# Altium PCB rp2350_led_control_pcb.PcbDoc (part 3 of 4)
Units mm, origin at the board's own origin, x right, y up, seen from the top; angles counter-clockwise.
Board outline 143.9 x 131.3 mm, 4 copper layers (L1(SIG), L2(GND), L3(PWR), L4(SIG)), stack 1.591 mm thick; 168 components, 192 nets, 814 pads, 1003 vias.
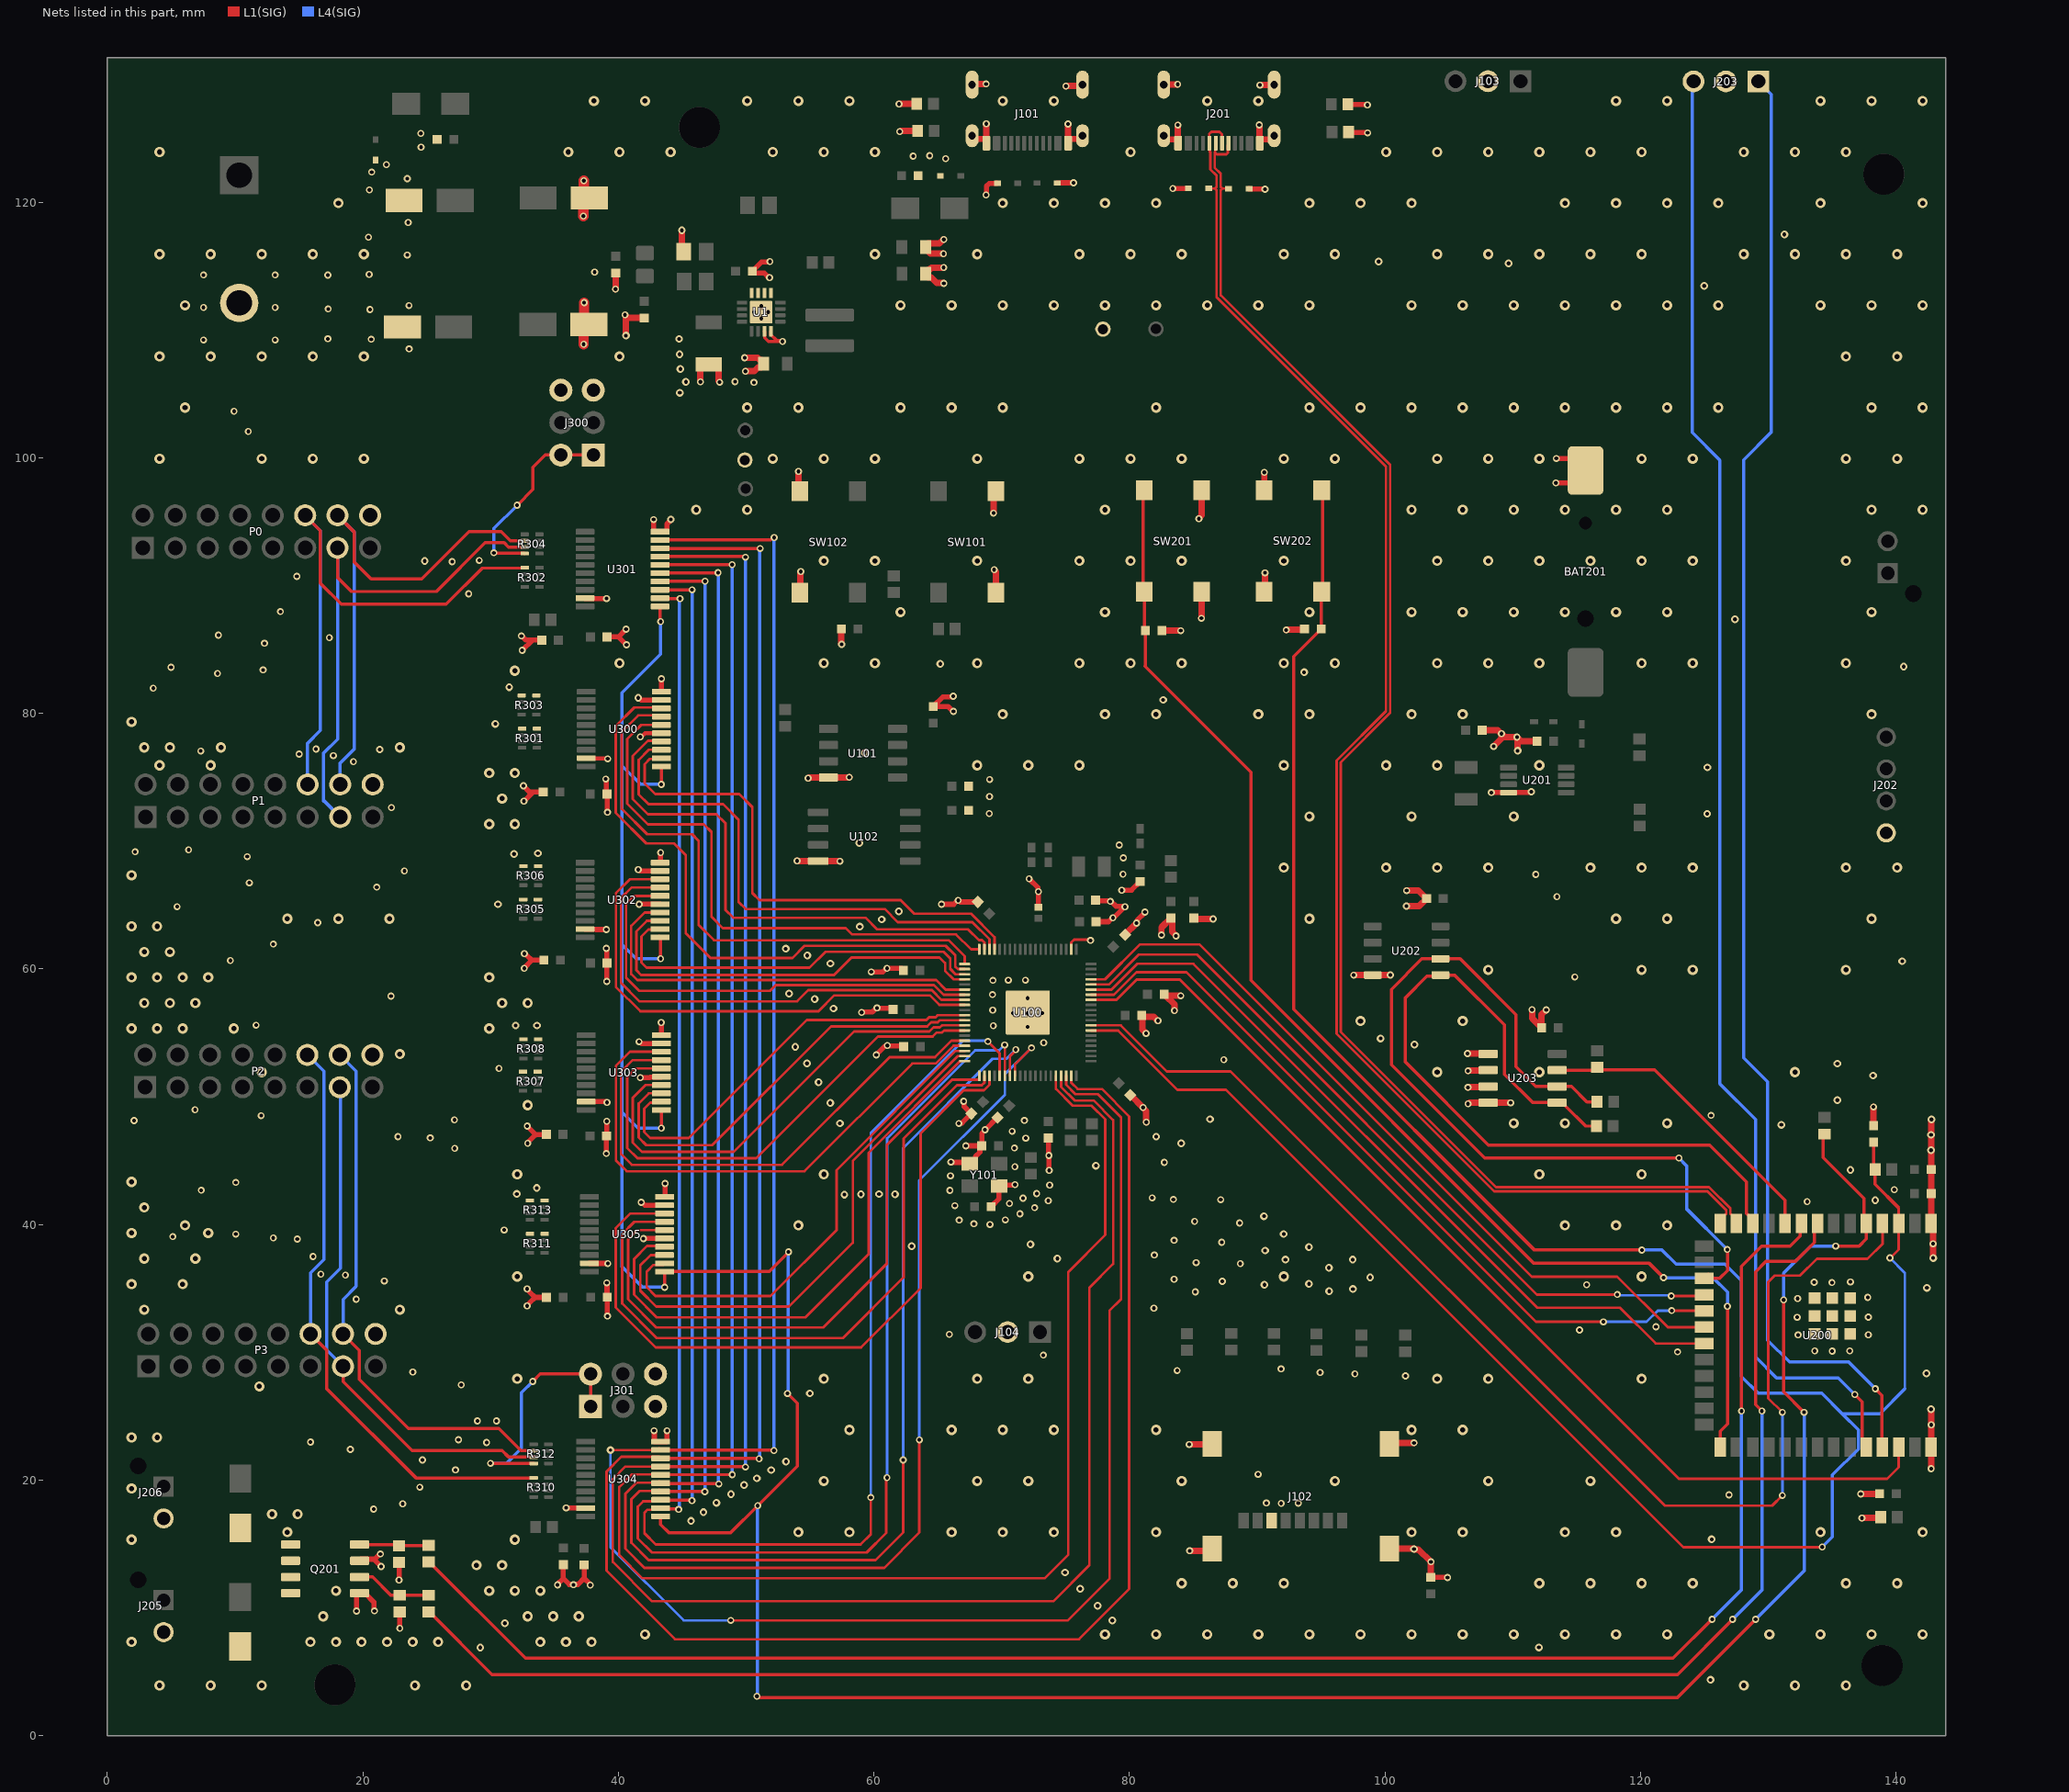
[diagram p4: the nets of this part, all layers, seen from the top]

## Via types
v1: diameter 0.55, hole 0.3, L1(SIG) to L4(SIG), 508 vias
v2: diameter 0.8, hole 0.4, L1(SIG) to L4(SIG), 383 vias
v3: diameter 0.6, hole 0.3, L1(SIG) to L4(SIG), 111 vias
v4: diameter 0.6, hole 0.25, L1(SIG) to L4(SIG), 1 vias

## Nets (pads, with @x,y where several pads share a name; then routed paths per layer and width w, separated by ;. In a path a pad name is that pad's centre, name@x,y a point inside that pad or via, vN(x,y) a via of type N, cw(c..) or ccw(c..) an arc to the next point about the centre after c; other vN are vias at no path point) (continued)
CLK_0: P0.13 P1.13 R304.6 | length 41.3
  L1(SIG) w0.25: P0.13@18.02,92.95 18.02,90.608 19.094,89.534 25.756,89.534 29.572,93.349 31.055,93.349 31.396,93.009 R304.6@32.658,93.009 ; P1.13@18.186,71.89 P1.13@18.22,71.89
  L4(SIG) w0.25: P0.13@18.02,92.95 18.02,77.973 16.899,76.852 16.899,73.142 16.968,73.142 P1.13@18.22,71.89
CLK_1: P2.13 P3.13 R312.6 | length 41.4
  L1(SIG) w0.25: P3.13@18.448,28.896 18.448,27.713 23.86,22.3 30.903,22.3 31.381,21.822 33.348,21.822 R312.6@33.373,21.797
  L4(SIG) w0.25: P2.13@18.194,50.74 18.249,50.685 18.249,36.57 17.172,35.493 17.172,30.172 P3.13@18.448,28.896
D0: P0.12 P1.12 R302.8 | length 45.7
  L1(SIG) w0.25: P0.12@15.48,95.49 16.667,94.302 16.667,90.182 18.313,88.536 26.515,88.536 29.344,91.365 32.369,91.365 32.645,91.365 R302.8@32.67,91.39 ; P1.12@15.667,74.443 P1.12@15.68,74.43
  L4(SIG) w0.25: P0.12@15.48,95.49 16.666,94.304 16.666,93.004 cw(c15.48,92.95) 16.666,92.896 16.666,78.651 15.654,77.639 15.654,74.456 P1.12@15.68,74.43
D1: P2.12 P3.12 R310.8 | length 46.7
  L1(SIG) w0.25: P3.12@15.908,31.436 17.15,30.194 17.15,27.175 24.157,20.168 R310.8@33.373,20.168
  L4(SIG) w0.25: P2.12@15.654,53.28 16.939,51.995 16.939,37.258 15.908,36.227 P3.12@15.908,31.436
E0: J300.1 J300.2 R304.5 | length 15.5
  L1(SIG) w0.25: v1(30.246,92.563) 30.276,92.534 32.633,92.534 R304.5@32.658,92.509 ; v1(32.071,96.284) 33.313,97.526 33.313,99.255 34.27,100.212 J300.1@38.033,100.212
  L4(SIG) w0.25: v1(30.246,92.563) 30.246,94.464 32.066,96.284 v1(32.071,96.284)
E1: J301.1 J301.2 R312.5 | length 19.2
  L1(SIG) w0.25: v1(29.989,21.31) 29.995,21.304 33.366,21.304 R312.5@33.373,21.297 ; v1(33.294,27.718) 33.882,28.307 37.813,28.307 J301.2@37.82,28.3 J301.1@37.82,25.76
  L4(SIG) w0.25: v1(29.989,21.31) 31.234,21.31 32.418,22.494 32.418,26.842 v1(33.294,27.718)
EEPROM_WP: R211.2 U200.10 U203.7 | length 24.1
  L1(SIG) w0.25: U203.7@113.474,52.075 116.375,52.075 R211.2@116.6,52.3 116.8,52.1 121.1,52.1 131.314,41.886 U200.10@131.314,40.19 ; U200.10@131.2,40.19 U200.10@131.314,40.076
EN_DISPLAY: R208.2 U200.5 U300.1 U301.1 U302.1 U303.1 U304.1 U305.1 | length 257
  L1(SIG) w0.25: U302.1@43.2,62.565 43.3,62.465 v1(43.3,60.8) ; U301.1@43.258,88.365 43.258,87.226 v1(43.3,87.184) ; U304.1@43.304,17.157 43.304,16.538 43.981,15.861 48.761,15.861 v1(50.9,18) 53.99,21.09 53.99,26.022 v1(53.234,26.778) ; v1(43.358,47.542) U303.1@43.358,48.965 ; v1(43.358,74.442) U300.1@43.358,75.843 ; v1(43.612,35.088) U305.1@43.612,36.311 43.629,36.328 51.803,36.328 53.313,37.837 v1(53.313,37.854) ; v1(50.843,3.087) 50.925,3.087 51.051,2.961 122.861,2.961 v1(129,9.1) ; v1(131.2,34.1) 131.2,26.9 v1(132.8,25.3) ; R208.2@134.393,47.076 134.284,46.967 134.284,45.252 137.5,42.036 137.5,40.54 137.664,40.376 U200.5@137.664,40.076 137.664,38.864 137.109,38.309 v1(135.273,38.309)
  L4(SIG) w0.25: v1(43.3,60.8) 41.387,60.8 40.287,61.9 ; v1(43.3,87.184) 43.3,84.626 40.287,81.612 40.287,75.9 ; v1(43.358,47.542) 41.545,47.542 40.287,48.8 ; v1(43.358,74.442) 41.745,74.442 40.287,75.9 ; v1(43.612,35.088) 41.899,35.088 40.287,36.7 40.287,48.8 ; v1(50.843,3.087) 50.872,3.115 50.872,17.972 v1(50.9,18) ; v1(53.234,26.778) 53.273,26.818 53.273,37.814 v1(53.313,37.854) ; v1(129,9.1) 132.8,12.9 v1(132.8,25.3) ; v1(131.2,34.1) 131.2,36.2 133.309,38.309 v1(135.273,38.309) ; 40.287,48.8 40.287,61.9 ; 40.287,61.9 40.287,75.9
ESP-USB_N: D203.2 J201.A7 J201.B7 U200.13 | length 116.8
  L1(SIG) w0.2: 86.663,123.911 86.663,122.7 87.144,122.22 87.144,121.182 87.261,121.065 ; 86.7,123.948 86.7,124.575 J201.A7@86.75,124.625 ; 86.734,123.86 86.851,123.743 87.583,123.743 87.7,123.86 87.7,124.467 J201.B7@87.734,124.501 ; D203.2@87.755,121.049 87.739,121.065 87.261,121.065 ; U200.13@127.504,40.076 127.504,40.376 127.154,40.726 127.15,40.726 127.032,40.843 127.032,41.261 125.367,42.927 108.673,42.927 96.534,55.066 96.534,76.172 100.4,80.038 100.4,99.45 87.142,112.708 87.142,114.718 87.144,114.72 87.144,120.948 87.261,121.065
ESP-USB_P: D204.2 J201.A6 J201.B6 U200.14 | length 117.8
  L1(SIG) w0.2: D204.2@86.206,121.08 86.221,121.065 86.7,121.065 ; J201.B6@86.234,124.625 86.234,125.334 86.415,125.515 87.033,125.515 87.234,125.314 J201.A6@87.234,124.501 ; J201.B6@86.25,124.625 86.3,124.575 86.3,123.948 86.336,123.911 86.336,122.565 86.817,122.084 86.817,121.182 86.7,121.065 ; U200.14@126.234,40.076 126.234,40.376 126.584,40.726 126.588,40.726 126.705,40.843 126.705,41.126 125.231,42.6 108.538,42.6 96.207,54.93 96.207,76.307 100.073,80.173 100.073,99.314 86.815,112.572 86.815,114.854 86.817,114.855 86.817,120.948 86.7,121.065
ESP_BOOT: C208.2 SW201.3 SW201.4 U200.27 | length 101.7
  L1(SIG) w0.25: SW201.3@81.155,97.461 81.071,97.376 81.071,89.595 SW201.4@81.155,89.511 81.155,86.564 C208.2@81.244,86.475 81.244,83.732 81.206,83.695 89.501,75.4 89.501,59.099 111.641,36.959 120.682,36.959 v1(121.802,35.839) ; U200.27@126.234,22.576 126.234,23.834 126.8,24.4 v1(126.8,33.6)
  L4(SIG) w0.25: v1(121.802,35.839) 125.661,35.839 126.8,34.7 v1(126.8,33.6)
ESP_BUSY: U100.53 U200.38 | length 82
  L1(SIG) w0.2: U100.53@76.992,57.582 78.982,57.582 80.561,59.161 83.939,59.161 123,20.1 139.3,20.1 140.204,21.004 U200.38@140.204,22.576
ESP_CS: U100.56 U200.18 | length 60.1
  L1(SIG) w0.2: U100.56@76.992,58.782 78.382,58.782 80.723,61.123 85.277,61.123 111.881,34.519 v1(118.181,34.519) ; v1(122.4,34.4) 124.883,34.4 U200.18@124.984,34.501
  L4(SIG) w0.2: v1(118.181,34.519) 118.241,34.46 122.34,34.46 v1(122.4,34.4)
ESP_DAT_RDY: U100.48 U200.4 | length 98.9
  L1(SIG) w0.2: U100.48@76.992,55.582 79.318,55.582 82.913,51.987 87.913,51.987 121.9,18 130.3,18 v1(131.1,18.8) ; v1(131.1,25.3) 130,26.4 130,35.5 130.5,36 132.482,36 133.794,37.312 137.761,37.312 138.934,38.485 U200.4@138.934,40.076
  L4(SIG) w0.2: v1(131.1,18.8) v1(131.1,25.3)
ESP_DBG_RX: J203.3 U200.36 | length 115.4
  L1(SIG) w0.25: v1(136.768,26.699) 137.339,26.129 137.339,22.901 U200.36@137.664,22.576
  L4(SIG) w0.25: J203.3@124.143,129.454 124.039,129.349 124.039,101.982 126.212,99.809 126.212,51.006 129,48.218 129,29.638 130.641,27.997 135.471,27.997 v1(136.768,26.699)
ESP_DBG_TX: J203.1 U200.37 | length 115.4
  L1(SIG) w0.25: v1(138.379,27.143) 138.885,26.637 138.885,22.625 U200.37@138.934,22.576
  L4(SIG) w0.25: J203.1@129.223,129.454 130.235,128.443 130.235,102 128.077,99.842 128.077,53.046 129.953,51.17 129.953,30.947 131.664,29.236 136.286,29.236 v1(138.379,27.143)
ESP_MISO: U100.55 U200.21 | length 61.1
  L1(SIG) w0.2: U100.55@76.992,58.382 78.582,58.382 80.6,60.4 85,60.4 111.913,33.487 118.38,33.487 121.176,30.691 U200.21@124.984,30.691
ESP_MOSI: U100.54 U200.19 | length 60.4
  L1(SIG) w0.2: U100.54@76.992,57.982 78.782,57.982 80.538,59.738 84.462,59.738 111.816,32.384 v1(117.091,32.384) ; v1(122.436,33.259) 124.956,33.259 U200.19@124.984,33.231
  L4(SIG) w0.2: v1(117.091,32.384) 120.475,32.384 121.351,33.259 v1(122.436,33.259)
ESP_RESET: C206.2 C209.2 R203.2 SW202.3 SW202.4 U100.47 U200.3 | length 214.3
  L1(SIG) w0.2: U100.47@76.992,55.182 79.118,55.182 83.754,50.546 87.554,50.546 123.353,14.747 134.202,14.747 v1(134.217,14.763) ; v1(139.515,37.382) 139.545,37.382 140.204,38.041 U200.3@140.204,40.076
  L1(SIG) w0.25: SW202.3@95.05,89.325 95,89.275 C209.2@95,86.6 92.851,84.451 92.851,56.849 111.7,38 112.5,38 v1(120.1,38) ; SW202.3@95.092,89.743 95.122,89.773 SW202.4@95.122,97.461 ; C206.2@138.239,46.439 138.239,44.43 R203.2@138.36,44.309 138.36,43.14 140.2,41.3 U200.3@140.2,40.076
  L4(SIG) w0.2: v1(139.515,37.382) 140.684,36.213 140.684,27.147
  L4(SIG) w0.25: v1(120.1,38) 121.674,38 122.781,36.893 126.607,36.893 127.9,35.6 127.9,28.1 129.2,26.8 134.178,26.8 135.78,25.198 ; v1(134.217,14.763) 135.013,15.559 135.013,20.397 137.048,22.432 137.048,23.93 135.78,25.198 ; 140.684,27.147 138.735,25.198 135.78,25.198
ESP_SCK: U100.57 U200.20 | length 61.5
  L1(SIG) w0.2: U100.57@76.992,59.182 78.082,59.182 80.808,61.908 85.492,61.908 111.478,35.922 118.178,35.922 122.139,31.961 U200.20@124.984,31.961
FAN1_CMD: R212.1 U200.8 | length 141.4
  L1(SIG) w0.25: R212.1@25.151,9.687 25.201,9.687 30.102,4.786 122.886,4.786 v1(127.2,9.1) ; v1(129.5,25.4) 129,25.9 129,36.3 129.8,37.1 132.1,37.1 133.6,38.6 133.6,39.822 U200.8@133.854,40.076
  L4(SIG) w0.25: v1(127.2,9.1) 129.5,11.4 v1(129.5,25.4)
FAN1_GATE: Q201.2 R210.2 R212.2 | length 6
  L1(SIG) w0.254: Q201.2@19.742,12.415 20.755,12.415 22.177,10.993 22.878,10.993 R210.2@22.884,10.987 R212.2@25.151,10.987
FAN1_OUT: D205.2 J205.2 Q201.7 Q201.8
FAN2_CMD: R213.1 U200.9 | length 140
  L1(SIG) w0.25: R213.1@25.151,13.584 25.201,13.584 32.725,6.06 122.539,6.06 125.579,9.1 v1(125.6,9.1) ; v1(127.9,25.4) 127.9,36.709 129.48,38.289 131.689,38.289 132.497,39.097 132.497,39.989 U200.9@132.584,40.076
  L4(SIG) w0.25: v1(125.6,9.1) 127.9,11.4 v1(127.9,25.4)
FAN2_GATE: Q201.4 R213.2 R214.1 | length 5.5
  L1(SIG) w0.254: Q201.4@19.742,14.955 22.737,14.955 R214.1@22.833,14.859 22.859,14.884 R213.2@25.151,14.884
FAN2_OUT: D206.2 J206.2 Q201.5 Q201.6 | length 0.4
  L1(SIG) w0.254: Q201.5@13.917,14.955 Q201.5@14.342,14.955
GND: BAT201.N C1.2 C2.2 C3.2 C4.2 C5.1 C6.1 C7.1 C8.1 C9.1 C10.1 C101.1 C102.1 C103.1 C104.1 C105.1 C106.1 C107.1 C108.1 C109.1 C110.1 C111.1 C112.1 C113.1 C114.1 C115.1 C116.1 C117.1 C118.1 C119.1 C120.1 C121.1 C122.1 C123.1 C124.1 C125.1 C126.1 C127.1 C201.1 C202.1 C203.2 C204.1 C205.1 C206.1 C207.1 C208.1 C209.1 C210.1 C300.1 C301.1 C302.1 C303.1 C304.1 C305.1 C306.1 C307.1 C308.1 C309.1 C310.1 C311.1 D2.1 D102.1 D103.1 D104.1 D203.1 D204.1 J1.2 J101.A1_B12 J101.B1_A12 J101.SH1 J101.SH2 J101.SH3 J101.SH4 J102.6 J102.9 J102.10 J102.11 J102.12 J103.2 J104.2 J201.A1_B12 J201.B1_A12 J201.SH1 J201.SH2 J201.SH3 J201.SH4 J202.4 J203.2 J300.5 J300.6 J301.5 J301.6 P0.16 P1.16 P2.16 P3.16 Q201.1 Q201.3 R3.2 R107.1 R108.1 R201.1 R202.1 R209.2 R210.1 R214.2 R301.4 R301.8 R303.4 R303.8 R305.4 R305.8 R306.4 R306.8 R307.4 R307.8 R308.4 R308.8 R311.4 R311.8 R313.4 R313.8 SW101.1 SW101.2 SW102.1 SW102.2 SW201.1 SW201.2 SW202.1 SW202.2 TP1.1 TP2.1 U1.5 U1.6 U1.7 U1.8 U1.15 U1.16 U1.17 U100.62 U100.81 U101.4 U102.4 U200.1 U200.40 U200.41 U200.42 U200.43 U200.44 U200.45 U200.46 U200.47 U200.48 U200.49 U201.4 U202.4 U203.1 U203.2 U203.3 U203.4 U300.5 U300.9 U300.10 U300.19 U301.10 U301.19 U302.5 U302.9 U302.10 U302.19 U303.5 U303.9 U303.10 U303.19 U304.10 U304.19 U305.5 U305.9 U305.10 U305.19 Y101.2 Y101.4 | length 284
  L1(SIG) w0.2: U100.62@75.442,61.532 75.442,62.067 75.672,62.297 76.882,62.297 v1(76.952,62.227)
  L1(SIG) w0.25: U1.15@51.425,109.894 51.45,109.869 51.45,109.392 51.746,109.096 v1(52.84,109.096) 52.773,109.163 52.406,109.163 51.925,109.644 U1.16@51.925,109.894
  L1(SIG) w0.3: U300.19@37.482,76.493 37.508,76.467 39.128,76.467 v1(39.154,76.441) ; v1(41.717,78.157) 41.798,78.157 42.085,78.443 U300.5@43.358,78.443
  L1(SIG) w0.4: v1(19.503,9.752) 19.503,11.02 19.628,11.145 Q201.1@19.742,11.145 20.167,11.145 20.866,10.446 20.866,9.8 v1(20.904,9.762) ; Q201.3@19.742,13.685 19.867,13.81 20.913,13.81 ; v1(21.374,14.217) 21.32,14.217 20.913,13.81 ; v1(21.421,13.24) 20.913,13.748 20.913,13.81 ; v1(22.831,12.177) 22.832,12.179 22.832,13.557 R214.2@22.833,13.559 ; R210.1@22.884,9.687 R210.1@22.884,9.687 22.886,8.41 v1(22.887,8.408) ; v1(32.4,86.053) 32.441,86.053 32.763,85.731 33.272,85.731 ; v1@32.47,84.929 33.272,85.731 ; v1(32.561,74.327) 33.014,73.874 ; v1(32.599,73.122) 33.323,73.846 ; v1(32.63,60.041) 32.63,60.081 33.209,60.66 33.209,60.683 33.211,60.683 ; v1(32.642,61.197) 32.682,61.197 33.039,60.841 33.053,60.841 33.211,60.683 ; v1(32.853,33.633) 32.853,33.673 33.363,34.183 33.363,34.296 ; v1(32.853,34.956) 32.853,34.915 33.363,34.405 33.363,34.296 ; v1(32.86,47.7) 33.512,47.048 ; v1(32.895,46.358) 32.895,46.397 33.512,47.014 33.512,47.048 ; 33.042,73.846 33.323,73.846 ; C304.1@34,85.731 33.272,85.731 ; C302.1@34.115,73.846 33.323,73.846 ; C300.1@34.159,60.701 34.14,60.683 33.211,60.683 ; C308.1@34.361,47.048 33.512,47.048 ; C306.1@34.37,34.296 33.363,34.296 ; v1(35.231,11.798) 35.231,11.852 35.686,12.307 ; C310.1@35.686,13.388 35.686,12.307 ; v1(35.905,17.828) 35.916,17.817 37.418,17.817 U304.19@37.428,17.807 ; C311.1@37.312,13.354 37.312,12.32 ; U302.19@37.382,63.115 37.407,63.09 38.252,63.09 38.261,63.081 v1(39.049,63.081) ; U301.19@37.382,89.015 37.407,88.99 38.252,88.99 38.257,88.986 v1(39.069,88.986) ; U303.19@37.482,49.615 38.986,49.615 39.054,49.546 v1(39.108,49.546) ; U305.19@37.736,36.961 37.742,36.955 39.166,36.955 v1(39.172,36.949) ; v1(37.8,11.777) 37.8,11.832 37.312,12.32 ; v1(39.007,74.86) 39.046,74.821 39.046,73.745 C303.1@39.101,73.689 39.12,73.67 39.12,72.272 v1(39.139,72.253) ; v1(39.048,61.606) 39.08,61.574 39.08,60.482 C301.1@39.112,60.45 39.098,60.436 39.098,59.035 v1(39.084,59.021) ; v1(39.054,45.551) 39.063,45.56 39.063,46.92 C309.1@39.072,46.929 39.078,46.935 39.078,48.074 v1(39.084,48.08) ; v1(39.085,35.437) 39.108,35.414 39.108,34.331 C307.1@39.13,34.309 39.135,34.304 39.135,32.838 v1(39.14,32.834) ; C305.1@39.107,85.978 39.993,85.978 ; v1(40.598,86.583) 39.993,85.978 ; v1(40.635,85.368) 40.603,85.368 39.993,85.978 ; v1(41.548,67.77) 41.602,67.77 41.707,67.665 U302.9@43.258,67.665 ; v3(41.548,81.212) 41.602,81.212 41.771,81.043 U300.9@43.358,81.043 ; v1(41.614,54.307) 41.668,54.307 41.81,54.165 U303.9@43.358,54.165 ; v1(41.619,65.058) 41.622,65.061 43.254,65.061 U302.5@43.258,65.065 ; v1(41.706,51.497) 42.444,51.497 42.488,51.54 43.333,51.54 U303.5@43.358,51.565 ; v1(41.782,41.735) 41.836,41.735 42.06,41.511 U305.9@43.612,41.511 ; v1(41.957,38.892) 41.966,38.901 43.602,38.901 U305.5@43.612,38.911 ; v1(42.75,95.165) 42.764,95.152 42.764,94.24 42.789,94.215 U301.10@43.258,94.215 43.771,94.215 43.796,94.24 43.796,94.811 44.103,95.118 v1(44.103,95.173) ; v1(42.796,23.864) 42.809,23.85 42.809,23.032 42.834,23.007 U304.10@43.304,23.007 43.772,23.007 43.797,23.032 43.797,23.852 v1(43.809,23.864) ; U302.10@43.258,68.315 43.28,68.315 43.305,68.34 v1(43.305,69.103) ; v1(43.351,55.809) 43.351,54.822 U303.10@43.358,54.815 ; U300.10@43.358,81.693 43.367,81.702 v1(43.367,82.7) ; U305.10@43.612,42.161 43.624,42.161 43.649,42.186 v1(43.649,43.203) ; U300.10@43.793,81.693 U300.10@43.818,81.718 ; v1(51.828,114.095) 51.774,114.095 51.425,114.445 50.625,114.445 C10.1@50.475,114.594 51.195,115.315 51.819,115.315 v1(51.857,115.353) ; v1(59.033,56.6) 59.062,56.629 59.88,56.629 60.218,56.967 60.219,56.967 v1(60.239,56.947) 60.277,56.909 61.415,56.909 C115.1@61.488,56.837 ; v1(59.792,59.766) 60.701,59.766 60.981,60.046 v1(61.022,60.046) 61.918,60.046 61.932,60.033 62.153,60.033 C121.1@62.303,59.883 ; v1(60.18,53.272) 60.893,53.985 61.015,53.985 v1(61.044,54.014) 61.082,53.976 62.264,53.976 C123.1@62.326,53.913 ; v1(65.282,65.058) 66.246,65.058 66.552,65.364 v1(66.592,65.364) 66.633,65.364 66.757,65.24 C122.1@68.118,65.24 ; v1(66.023,44.889) 66.052,44.86 67.626,44.86 67.674,44.812 67.944,45.082 67.944,45.317 68.289,45.662 C127.1@68.289,46.008 ; v1(66.2,81.336) 66.162,81.298 65.408,81.298 C104.1@64.642,80.532 65.797,80.532 66.173,80.156 v1(66.227,80.156) ; v1(66.646,47.906) 66.685,47.945 66.892,47.945 C120.1@67.618,48.671 67.063,49.227 67.063,49.604 v1(67.024,49.643) ; v1(67.186,46.153) 68.434,46.153 C127.1@68.439,46.158 68.439,47.111 68.692,47.364 v1(68.692,47.418) 68.707,47.418 69.652,48.364 C119.1@69.667,48.364 ; v1(68.768,120.56) 68.807,120.599 68.807,121.252 69.031,121.476 69.595,121.476 D103.1@69.605,121.486 ; v1(69.076,39.999) v1@69.105,40.027 ; C126.1@69.105,41.329 C126.1@69.169,41.392 69.794,42.018 Y101.4@69.794,43.007 ; Y101.4@69.655,43.146 Y101.4@69.794,43.007 ; v1@70.24,40.401 v1(70.278,40.363) ; v1@71.075,43.078 v1(71.037,43.116) 70.998,43.078 69.865,43.078 Y101.4@69.794,43.007 ; v1(71.663,42.057) v1@71.663,42.111 ; v1(72.141,67.056) 72.84,66.358 72.84,66.079 v1(72.869,66.05) 72.866,66.047 72.866,64.83 C112.1@72.862,64.827 ; C114.1@73.635,46.767 73.662,46.74 73.662,45.424 v1(73.689,45.397) 73.7,45.387 73.7,44.243 v1(73.71,44.232) ; D104.1@74.352,121.5 74.362,121.51 74.705,121.51 74.714,121.519 v1(75.614,121.519) ; C108.1@77.35,65.385 77.412,65.323 78.466,65.323 v1(78.504,65.285) 78.558,65.285 78.948,64.894 79.602,64.894 v1(79.641,64.856) 79.603,64.856 78.741,63.995 v1(78.704,63.995) 78.649,63.995 78.348,63.694 C109.1@77.38,63.694 ; v1(79.389,66.16) 80.155,66.16 C110.1@80.835,66.84 ; v1(80.552,63.587) 80.59,63.625 80.59,63.793 81.211,64.413 v1(81.211,64.445) ; v1(83.392,121.062) 83.4,121.071 84.597,121.071 D204.1@84.606,121.08 ; D203.1@89.355,121.049 89.365,121.039 90.582,121.039 v1(90.603,121.018) ; R201.1@97.023,127.658 97.049,127.631 98.589,127.631 v1(98.616,127.604) ; R202.1@97.075,125.495 97.111,125.459 98.6,125.459 v1(98.636,125.424) ; C111.1@103.574,12.389 103.582,12.382 104.878,12.382 v1(104.886,12.374) ; v1(108.328,73.799) U201.4@109.67,73.799 109.695,73.824 111.409,73.824 v1(111.445,73.86) ; v1(113.378,98.037) 114.737,98.037 BAT201.N@115.7,99 114.754,99.946 v1(113.412,99.946) ; 35.686,12.307 36.156,11.837 36.451,11.837 v1(36.48,11.808) 36.509,11.837 36.828,11.837 37.312,12.32
  L1(SIG) w0.5: v1(39.767,113.194) 39.776,113.202 39.776,114.456 C6.1@39.784,114.464 ; v1(40.513,111.181) 40.513,111.168 40.588,111.093 v3(40.588,109.557) ; 40.77,110.938 C5.1@42.011,110.938 ; v3(44.961,117.796) 44.98,117.777 44.98,116.268 R3.2@45.119,116.128 ; v1(46.414,105.944) 46.414,106.994 46.714,107.294 C9.1@47.075,107.294 47.55,107.294 47.85,106.994 47.85,105.994 47.919,105.925 v1(47.919,105.911) ; v1(49.88,107.831) 49.885,107.826 50.905,107.826 51.066,107.665 51.191,107.665 51.366,107.49 C8.1@51.366,107.365 51.366,107.24 51.191,107.065 50.941,107.065 50.655,106.778 49.95,106.778 v1(49.941,106.768) ; v1(53.987,68.457) 53.995,68.45 55.624,68.45 U102.4@55.632,68.442 55.64,68.434 57.327,68.434 v1(57.335,68.427) ; v1(54.095,98.925) 54.104,98.915 54.104,97.495 SW102.2@54.212,97.387 ; SW102.1@54.212,89.437 54.246,89.471 54.246,91.053 54.27,91.078 v1(54.27,91.092) ; v1(54.843,74.918) 54.87,74.918 54.929,74.977 U101.4@56.442,74.977 56.453,74.988 58.055,74.988 v1(58.066,74.999) ; C105.1@57.45,86.6 57.45,86.503 57.447,86.5 57.447,85.432 57.47,85.409 v1(57.47,85.396) ; v1(61.967,127.683) 61.977,127.693 63.414,127.693 R108.1@63.424,127.703 ; v1(62.017,125.526) 62.044,125.526 62.094,125.575 R107.1@63.417,125.575 R107.1@63.492,125.575 ; v1(65.443,115.964) 65.424,115.983 64.408,115.983 64.036,116.355 C102.1@64.036,116.48 64.036,116.605 64.211,116.78 65.136,116.78 65.437,117.082 v1(65.465,117.082) ; v1(65.46,114.882) 65.441,114.863 64.498,114.863 64.341,114.707 64.216,114.707 64.041,114.532 C101.1@64.041,114.407 64.041,114.282 64.216,114.107 64.466,114.107 64.901,113.672 65.443,113.672 v1(65.462,113.652) ; J101.SH2@67.68,125.2 67.68,124.95 J101.B1_A12@68.75,124.95 ; J101.SH4@67.68,129.2 67.713,129.233 68.755,129.233 v1(68.774,129.252) ; v1(68.794,126.134) 68.797,126.132 68.797,124.628 J101.B1_A12@68.8,124.625 ; v1(69.357,95.668) 69.376,95.687 69.376,97.221 SW101.1@69.542,97.387 ; v1(69.41,91.237) 69.41,91.21 69.542,91.078 SW101.2@69.542,89.437 ; v1(75.021,129.078) 75.04,129.097 76.217,129.097 J101.SH3@76.32,129.2 ; v1(75.193,126.119) 75.197,126.116 75.197,124.628 J101.A1_B12@75.2,124.625 75.25,124.95 76.32,124.95 J101.SH1@76.32,125.2 ; C116.1@79.66,62.66 79.66,62.677 80.552,63.569 v1(80.552,63.587) ; C118.1@80.07,50.133 80.075,50.133 81.053,49.155 v1(81.058,49.155) 81.058,49.142 81.308,48.892 81.308,48.011 v1(81.318,48.002) ; v1(81.301,54.949) 81.301,54.976 81.02,55.258 81.02,56.258 81.894,56.258 82.205,55.946 v1(82.233,55.946) ; v1(82.503,62.648) 82.503,63.243 C124.1@83.242,63.982 83.342,63.882 83.342,62.902 83.642,62.602 v1(83.642,62.575) ; C208.1@82.544,86.475 82.547,86.472 84.005,86.472 v1(84.008,86.469) ; J201.SH2@82.68,125.2 82.68,125.143 82.911,124.913 83.75,124.913 J201.B1_A12@83.792,124.871 ; J201.SH4@82.68,129.2 82.691,129.211 83.754,129.211 v1(83.766,129.223) ; v1(83.514,56.735) 83.512,56.738 83.512,57.212 82.811,57.912 83.011,57.912 83.027,57.896 v1(84.007,57.896) ; v1(83.783,126.036) 83.792,126.028 J201.B1_A12@83.792,124.871 ; J201.B1_A12@83.8,124.625 83.8,124.863 J201.B1_A12@83.792,124.871 ; v1(84.68,22.79) 86.42,22.79 J102.10@86.46,22.831 ; v1(84.713,14.468) 86.297,14.468 J102.9@86.46,14.631 ; C125.1@85.042,63.982 85.099,63.925 86.522,63.925 v1(86.541,63.906) ; v1(85.431,95.232) 85.431,95.259 85.659,95.487 SW201.1@85.659,97.461 ; v1(85.624,87.438) 85.642,87.456 85.642,89.04 SW201.2@85.659,89.057 ; v1(90.162,126.047) 90.181,126.028 90.181,124.644 J201.A1_B12@90.2,124.625 90.2,124.863 90.25,124.913 91.089,124.913 91.32,125.143 J201.SH1@91.32,125.2 ; v1(90.216,129.165) 90.233,129.182 91.302,129.182 J201.SH3@91.32,129.2 ; SW202.1@90.55,89.325 90.55,89.511 90.591,89.552 90.591,90.98 v1(90.61,91) ; SW202.2@90.55,97.275 90.55,97.461 90.551,97.462 90.551,98.859 v1(90.553,98.86) ; v1(92.268,86.52) 92.287,86.54 93.64,86.54 C209.1@93.7,86.6 ; v1(97.55,59.514) v1(97.55,59.514) 99.035,59.516 U202.4@99.036,59.517 99.042,59.522 100.409,59.522 v1(100.414,59.528) ; J102.12@100.35,14.631 100.358,14.623 102.266,14.623 v3(102.266,14.6) 102.286,14.581 102.62,14.581 v1@103.585,13.617 ; J102.11@100.35,22.831 100.43,22.911 v1(102.272,22.911) ; v1(101.679,64.912) 101.698,64.931 102.681,64.931 C201.1@103.25,65.5 102.622,66.128 v1(101.687,66.128) ; C111.1@103.574,12.389 103.574,12.488 103.576,12.489 103.576,13.575 103.594,13.593 v1(103.594,13.607) ; v1(106.45,53.384) 106.469,53.365 108.054,53.365 U203.1@108.074,53.345 ; v1(106.493,50.73) 106.512,50.749 108.018,50.749 U203.3@108.074,50.805 ; v1(106.501,49.446) 106.528,49.446 106.617,49.535 U203.4@108.074,49.535 108.08,49.529 109.822,49.529 v1(109.827,49.524) ; v1(106.501,52.023) 106.521,52.042 108.041,52.042 U203.2@108.074,52.075 ; C203.2@107.708,78.588 C203.2@107.608,78.688 108.814,78.688 109.091,78.411 v1(109.118,78.411) ; v1(108.498,77.415) 108.498,77.429 109.108,78.039 109.108,78.402 v1(109.118,78.411) ; v3(110.378,77.071) 110.359,77.09 110.359,78.096 110.325,78.13 v1(110.325,78.143) ; v1(111.503,56.808) 111.522,56.789 111.522,56.128 C210.1@112.25,55.4 112.25,56.427 v1(112.621,56.798) ; C202.1@111.886,77.826 C202.1@111.89,77.822 110.66,77.822 110.339,78.143 v1(110.325,78.143) ; v1(137.238,18.912) 137.248,18.921 138.707,18.921 C207.1@138.716,18.931 ; v1(137.324,17.024) 137.343,17.043 138.735,17.043 R209.2@138.789,17.097 ; v1(138.233,49.2) 138.236,49.197 138.236,47.742 C206.1@138.239,47.739 ; v1(142.745,20.896) U200.40@142.744,22.576 ; v3@142.745,25.549 v3(142.738,25.542) 142.745,25.536 142.745,24.326 v1(142.752,24.319) 142.748,24.315 U200.40@142.748,22.576 ; v3(142.772,48.217) 142.756,48.201 142.756,47.038 v3(142.74,47.022) v3(142.74,45.816) 142.742,45.814 142.742,44.313 C204.1@142.745,44.311 142.746,44.309 142.746,42.427 C205.1@142.748,42.425 142.746,42.423 142.746,40.078 U200.1@142.744,40.076 142.882,39.938 v1@142.882,38.504 ; v1@142.858,38.474 142.878,38.494 v1(142.892,38.494) 142.899,38.487 142.899,37.388 v3(142.907,37.38) ; v1(109.118,78.411) 109.128,78.402 109.155,78.402 109.403,78.153 110.315,78.153 v1(110.325,78.143)
  L1(SIG) w0.8: v1(37.251,118.916) 37.251,119.867 C3.2@37.72,120.336 37.291,120.765 v1(37.291,121.68) ; v1(37.28,108.881) 37.28,110.022 C2.2@37.688,110.43 37.319,110.799 v1(37.319,112.138)
  other v1: 20.839,17.727 23.11,18.14 91.869,18.179 90.715,18.205 93.205,18.2 126.926,18.841 24.452,19.447 90.063,20.449 27.249,20.794 24.663,21.577 19.022,22.402 29.681,22.937 15.898,22.977 27.482,23.155 28.961,24.629 30.455,24.629 27.69,27.445 101.604,28.153 97.639,28.315 94.914,28.415 23.899,28.454 83.73,28.575 91.869,28.695 73.255,29.775 122.901,30.026 134.998,30.096 133.633,30.111 136.378,30.103 132.335,31.357 137.828,31.367 65.898,31.407 115.226,31.747 121.208,31.992 132.261,32.744 137.828,32.755 81.907,33.454 19.474,34.156 132.298,34.205 137.787,34.291 85.154,34.726 115.779,35.284 134.978,35.457 133.59,35.482 136.431,35.506 87.266,35.552 21.672,35.582 83.485,35.713 18.63,36.041 16.709,36.113 88.675,36.935 85.21,37.017 16.098,37.499 81.939,37.609 87.217,38.609 83.484,38.758 14.867,38.863 12.988,38.946 5.117,39.051 10.044,39.248 31.055,39.569 67.819,40.053 88.621,40.121 85.098,40.246 66.672,40.345 71.426,40.837 72.573,41.31 66.326,41.474 70.6,41.645 133.038,41.793 73.648,41.857 83.436,41.958 87.137,41.939 81.773,42.089 72.737,42.421 65.946,42.671 7.348,42.676 139.861,42.718 73.754,43.078 10.045,43.288 65.989,43.808 71.028,44.516 82.726,44.863 27.184,45.955 70.99,45.986 71.881,46.756 25.268,46.773 22.746,46.872 82.092,46.874 70.811,47.298 2.088,48.13 71.772,48.14 27.169,48.182 12.038,48.521 125.523,48.536 6.863,48.982 30.65,52.21 87.382,52.892 73.287,54.225 72.022,55.467 69.34,55.553 11.642,55.598 70.875,56.538 72.022,56.525 73.168,56.538 69.297,56.771 72.015,57.713 22.196,57.872 69.276,57.99 69.308,59.099 70.517,59.119 71.852,59.119 114.855,59.372 9.631,60.661 12.99,61.939 16.461,63.623 5.462,64.868 113.452,65.657 21.083,66.395 11.115,66.738 111.802,67.39 79.491,67.418 23.252,67.662 79.519,68.685 10.95,68.785 2.172,69.166 6.36,69.321 79.201,69.69 69.023,72.161 22.238,72.625 69.042,73.484 69.051,74.826 19.26,76.214 17.687,76.694 15.01,76.807 7.309,77.054 21.318,77.169 16.327,77.204 3.589,81.963 8.62,83.122 12.187,83.398 4.982,83.601 32.468,84.929 12.294,85.481 17.373,85.922 8.695,86.12 13.547,87.961 28.28,89.354 14.834,90.718 26.986,91.864 29.104,91.966 11.028,102.062 9.918,103.642 50.601,105.895 49.127,105.962 23.622,108.52 7.525,109.221 13.134,109.221 20.649,109.269 17.253,109.305 51.183,110.893 50.617,111.398 51.728,111.404 20.555,111.594 17.281,111.646 7.525,111.763 13.134,111.763 23.608,111.911 51.177,111.893 17.253,114.293 7.525,114.304 13.134,114.304 20.485,114.343 38.135,114.526 23.468,115.869 20.438,117.255 23.546,118.413 20.509,120.967 23.476,121.844 20.692,122.355 21.833,122.934 65.606,123.406 63.071,123.607 64.365,123.643 24.554,124.303 24.528,125.378
  other v2: 4.08,3.928 8.08,3.928 12.08,3.928 24.08,3.928 28.08,3.928 128.08,3.928 132.08,3.928 136.08,3.928 1.892,7.334 15.892,7.334 17.892,7.334 19.892,7.334 21.892,7.334 23.892,7.334 25.892,7.334 33.892,7.334 35.892,7.334 37.892,7.334 42.08,7.928 78.08,7.928 82.08,7.928 86.08,7.928 90.08,7.928 94.08,7.928 98.08,7.928 102.08,7.928 106.08,7.928 110.08,7.928 114.08,7.928 118.08,7.928 122.08,7.928 130.08,7.928 134.08,7.928 138.08,7.928 142.08,7.928 16.892,9.334 32.892,9.334 34.892,9.334 36.892,9.334 17.892,11.334 29.892,11.334 31.892,11.334 33.892,11.334 84.08,11.928 88.08,11.928 92.08,11.928 112.08,11.928 116.08,11.928 120.08,11.928 124.08,11.928 136.08,11.928 140.08,11.928 28.892,13.334 30.892,13.334 1.892,15.334 31.892,15.334 14.08,15.928 54.08,15.928 58.08,15.928 66.08,15.928 70.08,15.928 74.08,15.928 82.08,15.928 102.08,15.928 106.08,15.928 114.08,15.928 118.08,15.928 134.08,15.928 142.08,15.928 12.892,17.334 14.892,17.334 1.892,19.334 56.08,19.928 68.08,19.928 72.08,19.928 84.08,19.928 96.08,19.928 108.08,19.928 116.08,19.928 1.892,23.334 3.892,23.334 58.08,23.928 66.08,23.928 70.08,23.928 74.08,23.928 82.08,23.928 102.08,23.928 106.08,23.928 11.892,27.334 32.08,27.928 56.08,27.928 68.08,27.928 72.08,27.928 104.08,27.928 108.08,27.928 120.08,27.928 2.892,33.334 22.892,33.334 1.892,35.334 5.892,35.334 32.08,35.928 72.08,35.928 92.08,35.928 120.08,35.928 2.892,37.334 6.892,37.334 1.892,39.334 7.892,39.334 6.08,39.928 54.08,39.928 114.08,39.928 118.08,39.928 122.08,39.928 2.892,41.334 1.892,43.334 32.08,43.928 56.08,43.928 112.08,43.928 120.08,43.928 110.08,47.928 114.08,47.928 122.08,47.928 32.892,49.334 12.08,51.928 104.08,51.928 112.08,51.928 132.08,51.928 22.892,53.334 1.892,55.334 3.892,55.334 5.892,55.334 9.892,55.334 29.892,55.334 98.08,55.928 106.08,55.928 2.892,57.334 4.892,57.334 6.892,57.334 30.892,57.334 32.892,57.334 1.892,59.334 3.892,59.334 5.892,59.334 7.892,59.334 29.892,59.334 108.08,59.928 120.08,59.928 124.08,59.928 136.08,59.928 2.892,61.334 4.892,61.334 1.892,63.334 3.892,63.334 14.08,63.928 18.08,63.928 22.08,63.928 94.08,63.928 118.08,63.928 122.08,63.928 138.08,63.928 1.892,67.334 92.08,67.928 100.08,67.928 104.08,67.928 108.08,67.928 116.08,67.928 120.08,67.928 124.08,67.928 136.08,67.928 140.08,67.928 29.892,71.334 31.892,71.334 94.08,71.928 102.08,71.928 110.08,71.928 30.892,73.334 29.892,75.334 31.892,75.334 4.08,75.928 8.08,75.928 68.08,75.928 72.08,75.928 76.08,75.928 92.08,75.928 100.08,75.928 104.08,75.928 112.08,75.928 2.892,77.334 4.892,77.334 8.892,77.334 22.892,77.334 1.892,79.334 70.08,79.928 78.08,79.928 82.08,79.928 90.08,79.928 94.08,79.928 102.08,79.928 106.08,79.928 138.08,79.928 31.892,83.334 40.08,83.928 56.08,83.928 60.08,83.928 68.08,83.928 76.08,83.928 80.08,83.928 84.08,83.928 92.08,83.928 96.08,83.928 104.08,83.928 108.08,83.928 112.08,83.928 120.08,83.928 124.08,83.928 136.08,83.928 62.08,87.928 78.08,87.928 94.08,87.928 102.08,87.928 106.08,87.928 110.08,87.928 114.08,87.928 118.08,87.928 122.08,87.928 138.08,87.928 56.08,91.928 60.08,91.928 68.08,91.928 76.08,91.928 80.08,91.928 84.08,91.928 92.08,91.928 104.08,91.928 108.08,91.928 112.08,91.928 116.08,91.928 120.08,91.928 124.08,91.928 136.08,91.928 46.08,95.928 50.08,95.928 78.08,95.928 102.08,95.928 106.08,95.928 110.08,95.928 114.08,95.928 118.08,95.928 122.08,95.928 138.08,95.928 142.08,95.928 4.08,99.928 12.08,99.928 16.08,99.928 20.08,99.928 52.08,99.928 56.08,99.928 60.08,99.928 68.08,99.928 76.08,99.928 80.08,99.928 84.08,99.928 92.08,99.928 96.08,99.928 104.08,99.928 108.08,99.928 112.08,99.928 120.08,99.928 124.08,99.928 136.08,99.928 140.08,99.928 6.08,103.928 50.08,103.928 54.08,103.928 62.08,103.928 66.08,103.928 70.08,103.928 82.08,103.928 94.08,103.928 98.08,103.928 102.08,103.928 106.08,103.928 110.08,103.928 114.08,103.928 118.08,103.928 122.08,103.928 126.08,103.928 138.08,103.928 142.08,103.928 4.08,107.928 8.08,107.928 12.08,107.928 16.08,107.928 20.08,107.928 40.08,107.928 136.08,107.928 140.08,107.928 6.08,111.928 62.08,111.928 66.08,111.928 70.08,111.928 74.08,111.928 78.08,111.928 82.08,111.928 86.08,111.928 90.08,111.928 94.08,111.928 102.08,111.928 106.08,111.928 110.08,111.928 114.08,111.928 118.08,111.928 122.08,111.928 126.08,111.928 134.08,111.928 138.08,111.928 142.08,111.928 4.08,115.928 8.08,115.928 12.08,115.928 16.08,115.928 20.08,115.928 60.08,115.928 68.08,115.928 76.08,115.928 80.08,115.928 84.08,115.928 92.08,115.928 96.08,115.928 104.08,115.928 108.08,115.928 112.08,115.928 116.08,115.928 120.08,115.928 128.08,115.928 132.08,115.928 136.08,115.928 140.08,115.928 18.08,119.928 70.08,119.928 74.08,119.928 78.08,119.928 82.08,119.928 94.08,119.928 98.08,119.928 102.08,119.928 114.08,119.928 118.08,119.928 122.08,119.928 126.08,119.928 134.08,119.928 142.08,119.928 4.08,123.928 36.08,123.928 40.08,123.928 44.08,123.928 52.08,123.928 56.08,123.928 60.08,123.928 80.08,123.928 100.08,123.928 104.08,123.928 108.08,123.928 112.08,123.928 116.08,123.928 120.08,123.928 128.08,123.928 132.08,123.928 136.08,123.928 38.08,127.928 42.08,127.928 50.08,127.928 54.08,127.928 58.08,127.928 70.08,127.928 74.08,127.928 86.08,127.928 90.08,127.928 118.08,127.928 122.08,127.928 134.08,127.928 138.08,127.928 142.08,127.928
  other v3: 125.477,4.371 29.189,6.899 112.039,6.901 31.115,8.799 78.65,9.011 77.503,10.159 76.139,11.493 74.951,12.773 125.564,15.365 45.684,16.805 46.65,17.483 47.669,18.223 48.808,18.894 49.838,19.611 50.831,20.136 51.95,20.788 53.116,21.449 54.983,26.785 142.378,28.348 95.625,34.778 97.482,34.953 142.411,35.039 90.558,35.281 94.049,35.356 98.833,35.854 95.606,36.608 92.207,37.251 97.467,37.252 74.355,37.333 90.611,37.958 94.049,38.237 62.947,38.309 72.249,38.444 92.068,39.254 90.526,40.646 138.372,41.894 57.687,42.337 58.976,42.365 61.65,42.365 32.042,42.392 60.403,42.379 33.606,42.855 136.422,44.275 77.375,44.6 84.052,46.352 131.012,47.8 57.338,47.912 86.303,48.238 56.58,49.522 135.4,49.735 55.667,51.132 138.198,51.658 135.4,52.586 54.754,52.612 53.84,53.903 102.304,54.083 99.656,54.555 31.95,55.567 33.629,55.574 56.834,56.905 55.358,57.643 53.358,58.072 56.59,60.425 140.48,60.603 54.782,61.047 53.093,61.58 58.891,63.304 60.604,63.875 61.945,64.496 30.575,65.058 31.824,69 33.697,69.046 58.851,69.851 125.212,72.138 125.236,75.765 59.264,76.909 30.366,79.177 82.637,81.054 31.454,82.048 93.671,83.217 140.595,83.663 65.186,83.866 127.392,87.359 24.844,91.924 44.799,105.083 45.281,105.937 44.848,106.95 44.781,108.098 44.748,109.301 124.981,113.448 109.675,115.213 99.5,115.351 131.263,117.48
HUB75_0_B1: U100.79 U300.4 | length 42.8
  L1(SIG) w0.2: U300.4@43.358,77.793 43.303,77.848 42.3,77.848 41.123,76.671 41.123,73.292 42.313,72.102 47.673,72.102 48.376,71.399 48.376,64.612 48.985,64.004 59.328,64.004 60.232,63.1 67.365,63.1 68.208,62.257 68.452,62.257 68.642,62.067 U100.79@68.642,61.532
HUB75_0_B2: U100.2 U300.8 | length 48.2
  L1(SIG) w0.2: U300.8@43.358,80.393 43.293,80.458 41.246,80.458 39.785,78.997 39.785,72.214 42.181,69.818 44.354,69.818 45.273,68.898 45.273,62.793 47.206,60.86 53.617,60.86 54.568,61.81 65.614,61.81 66.367,61.057 66.367,60.172 66.557,59.982 U100.2@67.092,59.982
HUB75_0_G1: U100.78 U300.3 | length 41.5
  L1(SIG) w0.2: U300.3@43.358,77.143 43.345,77.156 42.39,77.156 41.591,76.357 41.591,73.651 42.357,72.885 48.19,72.885 49.405,71.67 49.405,65.238 49.954,64.689 60.842,64.689 61.868,63.663 67.695,63.663 69.042,62.316 U100.78@69.042,61.532
HUB75_0_G2: U100.1 U300.7 | length 45.8
  L1(SIG) w0.2: U300.7@43.358,79.743 43.259,79.842 41.548,79.842 40.26,78.554 40.26,72.524 42.248,70.536 45.772,70.536 46.271,70.036 46.271,63.46 47.488,62.243 65.857,62.243 67.092,61.008 U100.1@67.092,60.382
HUB75_0_R1: U100.77 U300.2 | length 40.3
  L1(SIG) w0.2: U300.2@43.358,76.493 43.3,76.435 42.462,76.435 42.049,76.022 42.049,74.511 42.875,73.684 49.455,73.684 50.481,72.658 50.481,65.941 51.047,65.375 62.092,65.375 63.144,64.323 67.601,64.323 69.442,62.482 U100.77@69.442,61.532
HUB75_0_R2: U100.80 U300.6 | length 44.4
  L1(SIG) w0.2: U300.6@43.358,79.093 41.787,79.093 40.69,77.996 40.69,72.933 42.304,71.319 46.686,71.319 47.285,70.72 47.285,64.078 48.164,63.199 57.802,63.199 58.301,62.7 66.429,62.7 67.597,61.532 U100.80@68.242,61.532
HUB75_1_B1: U100.6 U302.4 | length 33.1
  L1(SIG) w0.2: U302.4@43.258,64.415 42.047,64.415 41,63.368 41,59.6 41.469,59.131 64.862,59.131 65.61,58.382 U100.6@67.092,58.382
HUB75_1_B2: U100.9 U302.8 | length 40.1
  L1(SIG) w0.2: U302.8@43.258,67.015 40.903,67.015 39.8,65.912 39.8,58.6 41.718,56.682 55.652,56.682 56.901,57.931 64.365,57.931 65.113,57.182 U100.9@67.092,57.182
HUB75_1_G1: U100.4 U302.3 | length 32.7
  L1(SIG) w0.2: U302.3@43.258,63.765 42.22,63.765 41.4,62.945 41.4,59.9 41.769,59.531 56.873,59.531 58.243,60.9 65.128,60.9 65.567,60.461 65.567,59.841 66.226,59.182 U100.4@67.092,59.182
HUB75_1_G2: U100.8 U302.7 | length 38.2
  L1(SIG) w0.2: U302.7@43.258,66.365 41.023,66.365 40.2,65.542 40.2,58.9 41.635,57.465 53.992,57.465 54.858,58.331 64.53,58.331 65.279,57.582 U100.8@67.092,57.582
HUB75_1_R1: U100.3 U302.2 | length 30.9
  L1(SIG) w0.2: U302.2@43.258,63.115 43.221,63.078 42.341,63.078 41.8,62.537 41.8,60.5 42.2,60.1 54.957,60.1 56.2,61.343 65.442,61.343 65.967,60.818 65.967,60.007 66.392,59.582 U100.3@67.092,59.582
HUB75_1_R2: U100.7 U302.6 | length 36.1
  L1(SIG) w0.2: U302.6@43.258,65.715 41.215,65.715 40.6,65.1 40.6,59.3 41.615,58.285 51.865,58.285 52.311,58.731 64.696,58.731 65.445,57.982 U100.7@67.092,57.982
HUB75_2_B1: U100.13 U303.4 | length 36.5
  L1(SIG) w0.2: U303.4@43.358,50.915 42.135,50.915 41.128,49.907 41.128,46.399 41.842,45.684 49.022,45.684 58.438,55.1 64.331,55.1 64.651,55.419 65.158,55.419 65.321,55.582 U100.13@67.092,55.582
HUB75_2_B2: U100.17 U303.8 | length 43.1
  L1(SIG) w0.2: U303.8@43.358,53.515 40.901,53.515 39.8,52.414 39.8,45.021 40.654,44.167 54.573,44.167 63.006,52.6 64.844,52.6 66.226,53.982 U100.17@67.092,53.982
HUB75_2_G1: U100.12 U303.3 | length 34.6
  L1(SIG) w0.2: U303.3@43.358,50.265 42.383,50.265 41.591,49.473 41.591,46.799 42.181,46.209 47.343,46.209 56.634,55.5 64.166,55.5 64.485,55.819 64.992,55.819 65.155,55.982 U100.12@67.092,55.982
HUB75_2_G2: U100.16 U303.7 | length 41.2
  L1(SIG) w0.2: U303.7@43.358,52.865 41.112,52.865 40.21,51.964 40.21,45.514 41.054,44.669 52.798,44.669 61.228,53.1 64.778,53.1 66.06,54.382 66.182,54.382 U100.16@67.092,54.382
HUB75_2_R1: U100.11 U303.2 | length 32.6
  L1(SIG) w0.2: U303.2@43.358,49.615 43.27,49.527 42.492,49.527 42.023,49.057 42.023,47.225 42.489,46.76 45.5,46.76 54.74,56 64.1,56 64.319,56.219 64.826,56.219 64.989,56.382 U100.11@67.092,56.382
HUB75_2_R2: U100.14 U303.6 | length 39.4
  L1(SIG) w0.2: U303.6@43.358,52.215 41.376,52.215 40.692,51.531 40.692,45.981 41.496,45.177 50.783,45.177 60.306,54.7 64.6,54.7 64.919,55.019 65.323,55.019 65.486,55.182 U100.14@67.092,55.182
HUB75_3_B1: U100.20 U305.4 | length 44.6
  L1(SIG) w0.2: U305.4@43.031,38.317 42.242,38.317 41.218,37.294 41.218,34.514 42.999,32.733 54.621,32.733 59.581,37.693 59.581,45.614 66.749,52.782 U100.20@67.092,52.782
HUB75_3_B2: U100.23 U305.8 | length 57.4
  L1(SIG) w0.2: U305.8@43.612,40.861 40.938,40.861 39.789,39.712 39.789,33.513 42.928,30.373 58.992,30.373 63.642,35.023 63.642,47.13 67.012,50.5 68.61,50.5 69.042,50.932 U100.23@69.042,51.632
HUB75_3_G1: U100.19 U305.3 | length 42
  L1(SIG) w0.2: U305.3@43.612,37.611 42.523,37.611 41.711,36.799 41.711,34.818 42.947,33.583 53.347,33.583 58.343,38.579 58.343,44.968 66.557,53.182 U100.19@67.092,53.182
HUB75_3_G2: U100.22 U305.7 | length 53.8
  L1(SIG) w0.2: U305.7@43.612,40.211 41.245,40.211 40.282,39.248 40.282,33.817 42.987,31.112 57.575,31.112 62.327,35.864 62.327,46.732 66.495,50.9 68.445,50.9 68.642,51.097 U100.22@68.642,51.632
HUB75_3_R1: U100.18 U305.2 | length 38.8
  L1(SIG) w0.2: U305.2@43.612,36.961 43.487,36.836 42.727,36.836 42.22,36.33 42.22,35.08 42.9,34.4 51.91,34.4 57.067,39.557 57.067,44.257 66.392,53.582 U100.18@67.092,53.582
HUB75_3_R2: U100.21 U305.6 | length 50
  L1(SIG) w0.2: U305.6@43.612,39.561 41.472,39.561 40.75,38.839 40.75,34.151 42.957,31.945 56.022,31.945 61.012,36.935 61.012,46.23 66.114,51.332 68.242,51.332 U100.21@68.242,51.632
HUB75_A: U100.25 U301.2 U304.2 | length 142.4
  L1(SIG) w0.2: U304.2@43.304,17.807 43.179,17.682 42.282,17.682 42.032,17.432 42.032,15.841 42.916,14.957 58.957,14.957 59.751,15.751 v1(59.751,18.637) ; v1(68.918,54.323) 69.842,53.399 U100.25@69.842,51.632
  L1(SIG) w0.25: U301.2@43.258,89.015 43.281,88.992 44.792,88.992 v1(44.815,88.97) ; U304.2@43.304,17.807 43.364,17.747 44.665,17.747 v1(44.713,17.7)
  L4(SIG) w0.2: v1(59.751,18.637) 59.751,47.157 66.976,54.381 68.86,54.381 v1(68.918,54.323)
  L4(SIG) w0.25: v1(44.713,17.7) 44.764,17.751 44.764,88.919 v1(44.815,88.97)
HUB75_B: U100.26 U301.3 U304.3 | length 146.9
  L1(SIG) w0.2: U304.3@43.304,18.457 43.179,18.332 41.932,18.332 41.519,17.919 41.519,15.431 42.62,14.33 59.43,14.33 60.966,15.866 60.966,20.137 v1(61.023,20.193) ; v1(70.227,54.053) 70.242,54.039 U100.26@70.242,51.632
  L1(SIG) w0.25: U301.3@43.258,89.665 43.261,89.668 45.759,89.668 v1(45.761,89.671) ; U304.3@43.304,18.457 43.334,18.427 45.725,18.427 v1(45.755,18.397)
  L4(SIG) w0.2: v1(61.023,20.193) 61.023,46.741 67.915,53.634 69.808,53.634 v1(70.227,54.053)
  L4(SIG) w0.25: v1(45.755,18.397) 45.761,18.403 v1(45.761,89.671)
HUB75_C: U100.27 U301.4 U304.4 | length 151.4
  L1(SIG) w0.2: U304.4@43.304,19.107 43.179,19.232 43.087,19.14 41.64,19.14 41.005,18.505 41.005,15.093 42.356,13.742 60.137,13.742 62.291,15.897 v1@62.291,21.533 ; v1(62.282,21.569) v1@62.317,21.533 ; U100.27@70.642,51.632 70.642,53.156 71.098,53.612 v1(71.098,53.69)
  L1(SIG) w0.25: U301.4@43.258,90.315 43.269,90.326 46.767,90.326 v1(46.778,90.337) ; U304.4@43.304,19.107 43.308,19.102 46.752,19.102 v1(46.756,19.098)
  L4(SIG) w0.2: v1(62.282,21.569) 62.282,45.968 69.277,52.964 70.372,52.964 v1(71.098,53.69)
  L4(SIG) w0.25: v1(46.756,19.098) 46.767,19.109 46.767,90.326 v1(46.778,90.337)
HUB75_CLK: U100.37 U301.7 U304.7 | length 176.5
  L1(SIG) w0.2: U304.7@43.304,21.057 40.557,21.057 39.563,20.063 39.563,13.589 42.634,10.517 74.033,10.517 76.858,13.343 76.858,35.061 78.721,36.923 78.721,48.179 77.2,49.7 75.708,49.7 74.642,50.766 U100.37@74.642,51.632
  L1(SIG) w0.25: U301.7@43.258,92.265 49.892,92.265 v1(49.94,92.218) ; U304.7@43.304,21.057 43.32,21.041 49.931,21.041 v1(49.947,21.025)
  L4(SIG) w0.25: v1(49.94,92.218) 49.943,92.214 49.943,21.028 v1(49.947,21.025)
HUB75_D: U100.28 U301.5 U304.5 | length 157.1
  L1(SIG) w0.2: U304.5@43.304,19.757 43.179,19.882 43.087,19.79 41.39,19.79 40.535,18.935 40.535,14.634 42.033,13.136 60.801,13.136 63.551,15.886 v1(63.551,23.145) ; U100.28@71.042,51.632 71.042,52.545 72.317,53.82 v1(72.332,53.82)
  L1(SIG) w0.25: U301.5@43.258,90.965 43.277,90.984 47.776,90.984 v1(47.795,91.003) ; U304.5@43.304,19.757 43.333,19.728 47.828,19.728 v1(47.857,19.699)
  L4(SIG) w0.2: v1(63.551,23.145) 63.551,43.453 70.25,50.153 70.25,51.753 72.317,53.82 v1(72.332,53.82)
  L4(SIG) w0.25: v1(47.795,91.003) 47.826,90.972 47.826,19.73 v1(47.857,19.699)
HUB75_E: U100.36 U301.6 U304.6 | length 169.3
  L1(SIG) w0.2: v1(48.908,20.424) 48.9,20.416 43.334,20.416 43.315,20.396 43.271,20.44 41.04,20.44 40.065,19.465 40.065,14.123 41.873,12.315 73.351,12.315 75.213,14.177 75.213,36.293 78.1,39.18 78.1,48.234 77.034,49.3 75.542,49.3 74.242,50.6 U100.36@74.242,51.632
  L1(SIG) w0.25: U301.6@43.258,91.615 43.266,91.623 48.895,91.623 v1(48.903,91.631)
  L4(SIG) w0.25: v1(48.903,91.631) 48.906,91.628 48.906,20.427 v1(48.908,20.424)
HUB75_LAT: U100.39 U301.8 U304.8 | length 187.3
  L1(SIG) w0.2: U304.8@43.304,21.707 43.179,21.832 40.232,21.832 39.06,20.66 39.06,12.919 44.432,7.547 76.047,7.547 79.969,11.469 79.969,48.465 77.834,50.6 75.939,50.6 75.442,51.097 U100.39@75.442,51.632
  L1(SIG) w0.25: U301.8@43.258,92.915 43.264,92.909 51.088,92.909 v1(51.094,92.902) ; U304.8@43.304,21.707 50.966,21.707 v1(51.01,21.663)
  L4(SIG) w0.25: v1(51.01,21.663) 51.052,21.705 51.052,92.861 v1(51.094,92.902)
HUB75_OE: U100.38 U301.9 U304.9 | length 186.3
  L1(SIG) w0.2: v4(39.371,22.353) 39.378,22.346 40.959,22.346 40.96,22.347 43.044,22.347 43.179,22.482 U304.9@43.304,22.357 ; v1(48.797,9.021) 75.176,9.021 78.434,12.279 78.434,33.245 79.341,34.151 79.341,48.394 77.534,50.2 75.774,50.2 75.042,50.932 U100.38@75.042,51.632
  L1(SIG) w0.25: U301.9@43.258,93.565 51.911,93.565 52.101,93.756 v1(52.183,93.756) ; U304.9@43.304,22.357 43.326,22.335 52.152,22.335 v1(52.174,22.314)
  L4(SIG) w0.2: v4(39.371,22.353) 39.371,14.765 45.115,9.021 v1(48.797,9.021)
  L4(SIG) w0.25: v1(52.174,22.314) 52.183,22.322 v1(52.183,93.756)
LAT_0: P0.14 P1.14 R304.7 | length 42
  L1(SIG) w0.25: P0.14@18.02,95.49 19.305,94.205 19.305,91.843 20.634,90.515 24.595,90.515 28.304,94.225 30.816,94.225 31.532,93.509 R304.7@32.658,93.509
  L4(SIG) w0.25: P0.14@18.02,95.49 19.305,94.205 19.305,77.18 18.221,76.095 P1.14@18.221,74.431
LAT_1: P2.14 P3.14 R312.7 | length 42.8
  L1(SIG) w0.25: P3.14@18.448,31.436 19.725,30.159 19.725,27.875 23.571,24.029 30.656,24.029 32.362,22.322 33.348,22.322 R312.7@33.373,22.297
  L4(SIG) w0.25: P2.14@18.194,53.28 19.473,52.001 19.473,35.161 18.448,34.136 P3.14@18.448,31.436
MEM_SCL: R204.2 U200.17 U202.6 U203.6 | length 68.4
  L1(SIG) w0.25: R204.2@116.6,49.6 115.8,49.6 114.595,50.805 U203.6@113.474,50.805 111.795,50.805 110.256,52.344 110.256,56.41 105.879,60.787 U202.6@104.339,60.787 102.887,60.787 100.5,58.4 100.5,52.5 107.8,45.2 v1(123,45.2) ; U200.17@125.309,36.096 U200.17@124.984,35.771 126.171,35.771 126.8,36.4 126.8,38.029 v1(126.785,38.044)
  L4(SIG) w0.25: v1(123,45.2) 123.6,44.6 123.6,41.229 v1(126.785,38.044)
MEM_SDA: R205.2 U200.12 U202.5 U203.5 | length 61.9
  L1(SIG) w0.25: R205.2@116.55,47.7 115.7,47.7 114.099,49.301 114.099,49.335 113.899,49.535 111.565,49.535 109.35,51.75 109.35,55.618 105.451,59.517 U202.5@104.339,59.517 104.245,59.422 103.269,59.422 101.6,57.754 101.6,52.7 108.1,46.2 125.4,46.2 128.279,43.321 128.279,40.871 128.774,40.376 U200.12@128.774,40.076